# Altium PCB PCB.PcbDoc (part 2 of 3)
Units mil, origin at the board's own origin, x right, y up, seen from the top; angles counter-clockwise.
Board outline 6000 x 4000 mil, 2 copper layers (Top Layer, Bottom Layer); 274 components, 212 nets, 893 pads, 35 vias.
Unrouted connection lines stored in the file: 511.
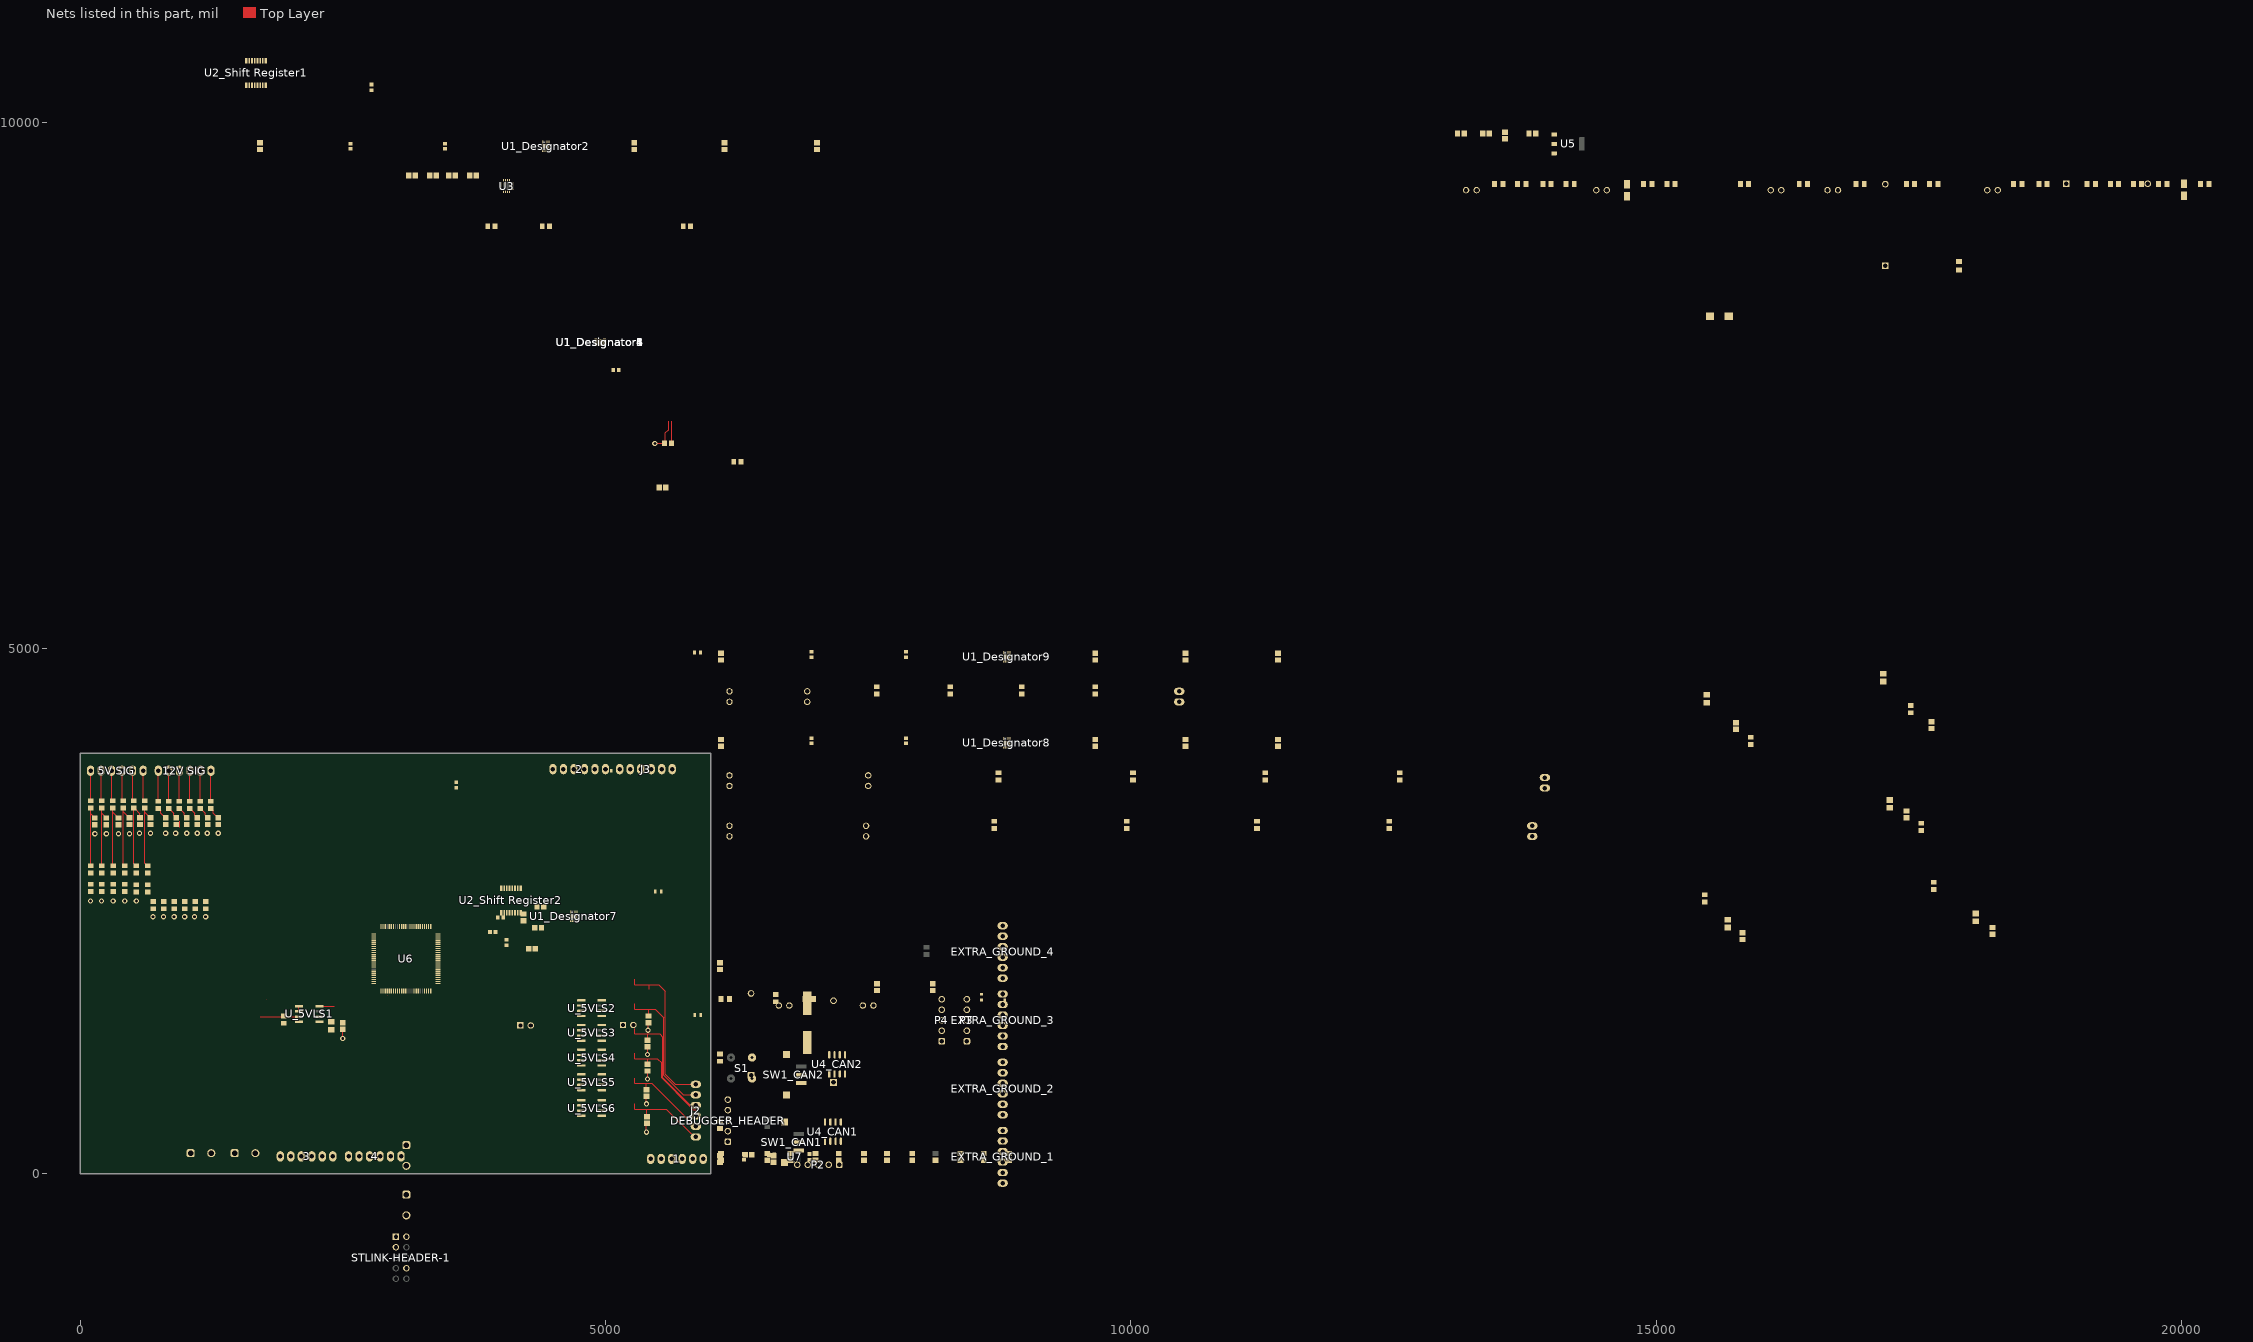
[diagram p2: the nets of this part, all layers, seen from the top]

## Part data (continued)
C8_5VLS1 C8_5VLS2 C8_5VLS3 C8_5VLS4 C8_5VLS5 C8_5VLS6 C28 C29 C30 C31 C32 C33 C34: library part CC0805MRX7R9BB104, "CAP CER 0.1UF 50V X7R 0805", Part Number=CC0805MRX7R9BB104
"C9_Shift Register1" "C9_Shift Register2" C40 C42: library part C0603C104K5RAC7411, "CAP CER 0.1UF 50V X7R 0603", Device Package="0603 (1608 Metric)", Manufacturer=KEMET, Operating Temperature="-55°C ~ 125°C", Supplier Part Number 1=399-C0603C104K5RAC7411CT-ND, Temperature Coefficient=X7R, Tolerance=±10%, Voltage - Rated=50V, Applications="Bypass, Decoupling", Capacitance="0.1 µF", ComponentLink1Description=Datasheet, ComponentLink1URL=https://api.kemet.com/component-edge/download/datasheet/C0603C104K5RAC7411.pdf, ComponentLink2Description="DigiKey Link", ComponentLink2URL=https://www.digikey.com/en/products/detail/kemet/C0603C104K5RAC7411/3317013, Lifecycle Status=Active, Minimum Order=1, Mounting Type="Surface Mount, MLCC", Package / Case="0603 (1608 Metric)", Packaging=TapeAndReel, Part Number=C0603C104K5RAC7411, Part Status=Active, partid=2233, Price=0.01, Series="SMD Comm X7R", Size / Dimension="0.063\" L x 0.031\" W (1.60mm x 0.80mm)", Supplier 1=DigiKey, Thickness (Max)="0.035\" (0.90mm)"
  "C9_Shift Register1" "C9_Shift Register2": LastUpdated="2023-06-20 7:12:54 PM"
  C40 C42: LastUpdated="2023-06-07 7:13:18 PM"
C10: library part CL21Y106KPQVPNE, "CAP CER 10UF 10V X7S 0805", Device Package="0805 (2012 Metric)", Manufacturer="Samsung Electro-Mechanics", Operating Temperature="-55°C ~ 125°C", Ratings=AEC-Q200, Supplier Part Number 1=1276-6685-1-ND, Temperature Coefficient=X7S, Tolerance=±10%, Voltage - Rated=10V, Applications=Automotive, Capacitance="10 µF", ComponentLink1Description=Datasheet, ComponentLink1URL=http://www.samsungsem.com/kr/support/product-search/mlcc/CL21Y106KPQVPNE.jsp, ComponentLink2Description="DigiKey Link", ComponentLink2URL=https://www.digikey.com/en/products/detail/samsung-electro-mechanics/CL21Y106KPQVPNE/5961169, LastUpdated="2023-10-22 7:13:43 PM", Lifecycle Status=Active, Minimum Order=1, Mounting Type="Surface Mount, MLCC", Package / Case="0805 (2012 Metric)", Packaging=TapeAndReel, Part Number=CL21Y106KPQVPNE, Part Status=Active, partid=2979, Price=0.06, Series=CL, Size / Dimension="0.079\" L x 0.049\" W (2.00mm x 1.25mm)", Supplier 1=DigiKey, Thickness (Max)="0.055\" (1.40mm)"
C12: library part C0805X332KARAC3316, "CAP CER 0805 3.3NF 250V X7R", Device Package="0805 (2012 Metric)", Manufacturer=KEMET, Operating Temperature="-55°C ~ 125°C", Ratings=AEC-Q200, Supplier Part Number 1=399-C0805X332KARAC3316CT-ND, Temperature Coefficient=X7R, Tolerance=±10%, Voltage - Rated=250V, Applications="Automotive, Boardflex Sensitive", Capacitance="3300 pF", ComponentLink1Description=Datasheet, ComponentLink1URL=https://api.kemet.com/component-edge/download/datasheet/C0805X332KARAC3316.pdf, ComponentLink2Description="DigiKey Link", ComponentLink2URL=https://www.digikey.com/en/products/detail/kemet/C0805X332KARAC3316/10315785, Features="Soft Termination", LastUpdated="2023-10-22 7:13:17 PM", Lifecycle Status=Active, Minimum Order=1, Mounting Type="Surface Mount, MLCC", Package / Case="0805 (2012 Metric)", Packaging=TapeAndReel, Part Number=C0805X332KARAC3316, Part Status=Active, partid=14175, Price=0.13, Series="SMD Auto X7R VW80808", Size / Dimension="0.079\" L x 0.049\" W (2.00mm x 1.25mm)", Supplier 1=DigiKey, Thickness (Max)="0.039\" (0.98mm)"
C13: library part CL21A226KOQNNNG, "CAP CER 22UF 16V X5R 0805", Device Package="0805 (2012 Metric)", Manufacturer="Samsung Electro-Mechanics", Operating Temperature="-55°C ~ 85°C", Supplier Part Number 1=1276-7092-1-ND, Temperature Coefficient=X5R, Tolerance=±10%, Voltage - Rated=16V, Applications="General Purpose", Capacitance="22 µF", ComponentLink1Description=Datasheet, ComponentLink1URL=//media.digikey.com/pdf/Data%20Sheets/Samsung%20PDFs/CL21A226KOQNNNG_Spec.pdf, ComponentLink2Description="DigiKey Link", ComponentLink2URL=https://www.digikey.com/en/products/detail/samsung-electro-mechanics/CL21A226KOQNNNG/3894433, LastUpdated="2023-10-22 7:13:43 PM", Lifecycle Status=Active, Minimum Order=1, Mounting Type="Surface Mount, MLCC", Package / Case="0805 (2012 Metric)", Packaging=TapeAndReel, Part Number=CL21A226KOQNNNG, Part Status=Active, partid=3000, Price=0.06, Series=CL, Size / Dimension="0.079\" L x 0.049\" W (2.00mm x 1.25mm)", Supplier 1=DigiKey, Thickness (Max)="0.055\" (1.40mm)"
C18: library part C2012X6S1C106K125AC, "CAP CER 10UF 16V X6S 0805", Device Package="0805 (2012 Metric)", Manufacturer="TDK Corporation", Operating Temperature="-55°C ~ 105°C", Supplier Part Number 1=445-7611-1-ND, Temperature Coefficient=X6S, Tolerance=±10%, Voltage - Rated=16V, Applications="General Purpose", Capacitance="10 µF", ComponentLink1Description=Datasheet, ComponentLink1URL=https://product.tdk.com/info/en/catalog/datasheets/mlcc_commercial_general_en.pdf?ref_disty=digikey, ComponentLink2Description="DigiKey Link", ComponentLink2URL=https://www.digikey.com/en/products/detail/tdk-corporation/C2012X6S1C106K125AC/2733046, Features="Low ESL", LastUpdated="2023-10-02 7:13:05 PM", Lifecycle Status=Active, Minimum Order=1, Mounting Type="Surface Mount, MLCC", Package / Case="0805 (2012 Metric)", Packaging=TapeAndReel, Part Number=C2012X6S1C106K125AC, Part Status=Active, partid=2995, Price=0.07, Series=C, Size / Dimension="0.079\" L x 0.049\" W (2.00mm x 1.25mm)", Supplier 1=DigiKey, Thickness (Max)="0.057\" (1.45mm)"
C20: library part PMK212BBJ107MG-T, "CAP CER 100UF 2.5V X5R 0805", Device Package="0805 (2012 Metric)", Manufacturer="Taiyo Yuden", Operating Temperature="-55°C ~ 85°C", Supplier Part Number 1=587-3978-1-ND, Temperature Coefficient=X5R, Tolerance=±20%, Voltage - Rated=2.5V, Applications="SMPS Filtering", Capacitance="100 µF", ComponentLink1Description=Datasheet, ComponentLink1URL="https://ds.yuden.co.jp/TYCOMPAS/ut/detail?pn=PMK212BBJ107MG-T  &u=M", ComponentLink2Description="DigiKey Link", ComponentLink2URL=https://www.digikey.com/en/products/detail/taiyo-yuden/PMK212BBJ107MG-T/4950524, LastUpdated="2023-10-02 7:12:56 PM", Lifecycle Status=Active, Minimum Order=1, Mounting Type="Surface Mount, MLCC", Package / Case="0805 (2012 Metric)", Packaging=TapeAndReel, Part Number=PMK212BBJ107MG-T, Part Status=Active, partid=7580, Price=0.48, Series=M, Size / Dimension="0.079\" L x 0.049\" W (2.00mm x 1.25mm)", Supplier 1=DigiKey, Thickness (Max)="0.053\" (1.35mm)"
C23 C24: library part CMP-2006-02836-2, "Chip Multilayer Ceramic Capacitors for General Purpose, 0603, 2.2uF, X7R, 15%, 10%, 10V", Capacitance=2.2uF, Case Code (Imperial)=0603, Case Code (Metric)=1608, Dielectric=X7R, Max Operating Temperature=125°C, Min Operating Temperature=-55°C, Package Quantity=1, Tolerance=10%, Voltage=10V, Case/Package=0603, Depth=0.8mm, Height=0.8mm, Lead Free="Lead Free", Length=1.6mm, Material=Ceramic, Mount="Surface Mount", Number of Pins=2, Packaging="Cut Tape", REACH SVHC="No SVHC", Termination=SMD/SMT, Thickness=0.035inch, Voltage Rating=10V, Voltage Rating (DC)=10V, Weight=7.1E-05oz, Width=0.031inch
C25 C27: library part CBR08C809CAGAC, "CAP CER 8PF 250V C0G/NP0 0805", Part Number=CBR08C809CAGAC
C41: library part C0603C103K4RECAUTO, "CAP CER 0603 10NF 16V X7R 10%", Device Package="0603 (1608 Metric)", Manufacturer=KEMET, Operating Temperature="-55°C ~ 125°C", Ratings=AEC-Q200, Supplier Part Number 1=399-17880-1-ND, Temperature Coefficient=X7R, Tolerance=±10%, Voltage - Rated=16V, Applications="Automotive, ESD Protection", Capacitance="10000 pF", ComponentLink1Description=Datasheet, ComponentLink1URL=https://api.kemet.com/component-edge/download/datasheet/C0603C103K4RECAUTO.pdf, ComponentLink2Description="DigiKey Link", ComponentLink2URL=https://www.digikey.com/en/products/detail/kemet/C0603C103K4RECAUTO/8640474, LastUpdated="2023-06-07 7:13:03 PM", Lifecycle Status=Active, Minimum Order=1, Mounting Type="Surface Mount, MLCC", Package / Case="0603 (1608 Metric)", Packaging=TapeAndReel, Part Number=C0603C103K4RECAUTO, Part Status=Active, partid=8251, Price=0.01, Series="ESD SMD Auto X7R", Size / Dimension="0.063\" L x 0.031\" W (1.60mm x 0.80mm)", Supplier 1=DigiKey, Thickness (Max)="0.034\" (0.87mm)"
C43: library part CC0603ZRY5V6BB225, "CAP CER 2.2UF 10V Y5V 0603", Device Package="0603 (1608 Metric)", Manufacturer=Yageo, Operating Temperature="-30°C ~ 85°C", Supplier Part Number 1=311-1450-1-ND, Temperature Coefficient="Y5V (F)", Tolerance="-20%, +80%", Voltage - Rated=10V, Applications="General Purpose", Capacitance="2.2 µF", ComponentLink1Description=Datasheet, ComponentLink1URL=http://www.yageo.com/documents/recent/UPY-GPHC_Y5V_6.3V-to-50V_8.pdf, ComponentLink2Description="DigiKey Link", ComponentLink2URL=https://www.digikey.com/en/products/detail/yageo/CC0603ZRY5V6BB225/2833615, LastUpdated="2023-06-07 7:13:18 PM", Lifecycle Status=Active, Minimum Order=1, Mounting Type="Surface Mount, MLCC", Package / Case="0603 (1608 Metric)", Packaging=TapeAndReel, Part Number=CC0603ZRY5V6BB225, Part Status=Active, partid=2248, Price=0.01, Series=CC, Size / Dimension="0.063\" L x 0.031\" W (1.60mm x 0.80mm)", Supplier 1=DigiKey, Thickness (Max)="0.035\" (0.90mm)"
C44: library part C0805X475J9RACAUTO, "CAP CER 4.7UF 6.3V X7R 0805", Part Number=C0805X475J9RACAUTO
D1 D2: library part CMP-0548-00224-2, "Transient Voltage Suppressor, 6.40 to 231 V, 14 V Stand-off Voltage, Uni-Directional, -55 to 155 degC, 2-pin DO-214AC, Pb-Free, Tape and Reel", Manufacturer="Vishay Semiconductor", Operating Junction and Storage Temperature Range="-55 to 150 degC", ComponentLink1Description="Manufacturer URL", ComponentLink1URL=http://www.vishay.com/, ComponentLink2Description=Datasheet, ComponentLink2URL=http://www.vishay.com/docs/88390/smaj50a.pdf, ComponentLink3Description="Package Specification", ComponentLink3URL=http://www.vishay.com/docs/88390/smaj50a.pdf, DatasheetVersion=12/8/2013, ID (uA)=1, IFSM="40 A", Mounting Technology="Surface Mount", PackageDescription="2-Pin DO-214AC (SMA), Body 4.245 x 2.665 mm", PackageReference=DO-214AC-2, Packing="Tape and Reel", PartNumber=SMAJ14A-E3/61, PPPM (W)="400, 300", RoHS=TRUE, VBR Uni-Directional (V)="6.4 to 231", VWM (V)=14
DEBUGGER_HEADER P2 P3 P4: library part CMP-1502-01068-2, Color=Black, Contact Resistance=20mΩ, Current Rating=3A, Max Operating Temperature=105°C, Min Operating Temperature=-40°C, Operating Supply Voltage=250V, Connector Type="Male Pin", Contact Material=Copper, Contact Mating Length=5.9944mm, Contact Plating=Gold, Gender=Male, Height=8.89mm, Lead Free="Lead Free", Lead Pitch=2.54mm, Mount="Through Hole", NexarPartId=32855526, Number of Contacts=5, Number of Pins=5, Number of Positions=5, Number of Rows=1, Orientation=Vertical, Packaging=Bulk, Pitch=2.54mm, REACH SVHC=Unknown, RoHS=Compliant, Termination=Solder, Voltage Rating=250V
"DS1_Motor Controller 1" "DS1_Motor Controller 2" DS1_Steering "DS2_Motor Controller 1" "DS2_Motor Controller 2" DS2_Steering DS5 DS6 DS7 DS8 DS9 DS12 DS13: library part CMP-2000-06413-1, "T-1 3/4 (5 mm) Low Current LED Lamp, Green, 1.9 V, -20 to 100 degC, 2-Pin THD, RoHS, Bulk", Color=Green, Dominant Wavelength/Color Temperature=569nm, Manufacturer=AvagoTechnologies, Package=2T-13/4, Package Description="2-Pin Through Hole Device, Dia 5.845 mm, Pitch 2.54 mm", Category=LEDs, Datasheet URL=http://docs.avagotech.com/docs/AV02-1557EN, Datasheet Version=07/2014, Intensity=2.3mcd, Lens Appearance=ColoredDiffused, Lens Shape Type=Circular, Manufacturer URL=http://www.avagotech.com/, Mounting=ThroughHole, Mounting Orientation=TopMount, Mounting Technology=ThroughHole, Number of LEDs=1, Package Reference=HLMP-4740, Packaging=Bulk, Peak Wavelength=565nm, Pin Count=2, Rad Hard=No, Type=Uni-Color, Viewing Angle=50°
"J1_Motor Controller 1" "J1_Motor Controller 2" J1_Steering: "TERM BLK 2P SIDE ENT 2.54MM PCB", Color=Green, Current=10A, Manufacturer="TE Connectivity AMP Connectors", Supplier Part Number 1=A98333-ND, Voltage=150V, ComponentLink1Description=Datasheet, ComponentLink1URL=https://www.te.com/commerce/DocumentDelivery/DDEController?Action=srchrtrv&DocNm=282834&DocType=Customer+Drawing&DocLang=English, ComponentLink2Description="DigiKey Link", ComponentLink2URL=http://digikey.com/product-detail/en/te-connectivity-amp-connectors/282834-2/A98333-ND/1150135, LastUpdated="2020-01-15 4:15:38 AM", Lifecycle Status=Active, Mating Orientation="Horizontal with Board", Minimum Order=1, Mounting Type="Through Hole", Number of Levels=1, Packaging=Bulk, Part Number=282834-2, Part Status=Active, Pitch="0.100\" (2.54mm)", Positions Per Level=2, Price=0.88, Series=Buchanan, Supplier 1=DigiKey, Wire Gauge="16-30 AWG", Wire Termination="Screw - Rising Cage Clamp"
J5 J6 J7 J8: library part CMP-1502-03324-2, Current Rating=16A, Max Operating Temperature=120°C, Min Operating Temperature=-30°C, Voltage Rating=300V, Contact Material="Nickel, Tin", Height=11.6mm, Lead Pitch=5mm, NexarPartId=78871135, Number of Contacts=2, Number of Pins=2, Number of Rows=1, Packaging=Box, RoHS=Non-Compliant
J9 J10: library part CMP-2000-05888-3, "CONN HEADER VERT 2POS 2.5MM", Color=Natural, Contact Resistance=20mR, Current Rating=3A, Housing Color=White, Insulation Resistance=1GR, Max Operating Temperature=85°C, Max Voltage Rating (AC)=250V, Min Operating Temperature=-25°C, Connector Type="Male Pin", Contact Material=Brass, Contact Plating=Tin, Contact Type="Male Pin", Depth=5.75mm, Fastening Type=Detent, Housing Material=Polyamide, Lead Free="Lead Free", Lead Pitch=2.5mm, Length=7.4mm, Max Current Rating=3A, Max Voltage Rating (DC)=250V, Mount="Through Hole", Number of Contacts=2, Number of Positions=2, Number of Rows=1, Orientation=Straight, Packaging=Bulk, Pitch=2.5mm, REACH SVHC="No SVHC", Series=XH, Termination=Solder, Voltage Rating=250V, Voltage Rating (AC)=250V, Wire/Cable Gauge=22AWG
L1: library part SRP5030T-2R2M, "FIXED IND 2.2UH 5.5A 35 MOHM SMD", Current - Saturation=9A, Current Rating (Amps)="5.5 A", DC Resistance (DCR)="35mOhm Max", Device Package=Nonstandard, Inductance Frequency - Test="100 kHz", Manufacturer="Bourns Inc.", Operating Temperature="-40°C ~ 125°C", Supplier Part Number 1=SRP5030T-2R2MCT-ND, Tolerance=±20%, ComponentLink1Description=Datasheet, ComponentLink1URL=https://www.bourns.com/docs/Product-Datasheets/SRP5030T.pdf, ComponentLink2Description="DigiKey Link", ComponentLink2URL=https://www.digikey.com/en/products/detail/bourns-inc/SRP5030T-2R2M/3986082, Height - Seated (Max)="0.118\" (3.00mm)", Inductance="2.2 µH", LastUpdated="2023-10-22 8:26:41 PM", Lifecycle Status=Active, Material - Core="Iron Powder", Minimum Order=1, Mounting Type="Surface Mount", Package / Case=Nonstandard, Packaging=TapeAndReel, Part Number=SRP5030T-2R2M, Part Status=Active, partid=7, Price=0.59, Series=SRP5030T, Shielding=Shielded, Size / Dimension="0.224\" L x 0.205\" W (5.70mm x 5.20mm)", Supplier 1=DigiKey, Type="Drum Core, Wirewound"
R1_Designator1 R1_Designator2 R1_Designator3 R1_Designator4 R1_Designator5 R1_Designator6 R2_Designator1 R2_Designator2 R2_Designator3 R2_Designator4 R2_Designator5 R2_Designator6 R4_1 R4_2 R4_3 R4_4 R4_5 R4_6: library part CRCW0805300KJNEA, "RES SMD 300K OHM 5% 1/8W 0805", Device Package="0805 (2012 Metric)", Manufacturer="Vishay Dale", Operating Temperature="-55°C ~ 155°C", Power (Watts)="0.125W, 1/8W", Ratings=AEC-Q200, Supplier Device Package=0805, Supplier Part Number 1=541-300KACT-ND, Temperature Coefficient=±200ppm/°C, Tolerance=±5%, ComponentLink1Description=Datasheet, ComponentLink1URL=http://www.vishay.com/docs/20035/dcrcwe3.pdf, ComponentLink2Description="DigiKey Link", ComponentLink2URL=https://www.digikey.com/en/products/detail/vishay-dale/CRCW0805300KJNEA/1175257, Composition="Thick Film", Features="Automotive AEC-Q200", Height - Seated (Max)="0.020\" (0.50mm)", LastUpdated="2023-10-02 7:52:37 PM", Lifecycle Status=Active, Minimum Order=1, Number of Terminations=2, Package / Case="0805 (2012 Metric)", Packaging=TapeAndReel, Part Number=CRCW0805300KJNEA, Part Status=Active, partid=29510, Price=0.01, Resistance="300 kOhms", Series=CRCW, Size / Dimension="0.079\" L x 0.049\" W (2.00mm x 1.25mm)", Supplier 1=DigiKey
R3_Designator1 R3_Designator2 R3_Designator3 R3_Designator4 R3_Designator5 R3_Designator6: library part RT0805DRD07150KL, "RES SMD 150K OHM 0.5% 1/8W 0805", Device Package="0805 (2012 Metric)", Manufacturer=Yageo, Operating Temperature="-55°C ~ 155°C", Power (Watts)="0.125W, 1/8W", Supplier Device Package=0805, Supplier Part Number 1=311-2706-1-ND, Temperature Coefficient=±25ppm/°C, Tolerance=±0.5%, ComponentLink1Description=Datasheet, ComponentLink1URL=https://www.yageo.com/upload/media/product/productsearch/datasheet/rchip/PYu-RT_1-to-0.01_RoHS_L_11.pdf, ComponentLink2Description="DigiKey Link", ComponentLink2URL=https://www.digikey.com/en/products/detail/yageo/RT0805DRD07150KL/1077874, Composition="Thin Film", Height - Seated (Max)="0.024\" (0.60mm)", LastUpdated="2023-10-02 7:52:44 PM", Lifecycle Status=Active, Minimum Order=1, Number of Terminations=2, Package / Case="0805 (2012 Metric)", Packaging=TapeAndReel, Part Number=RT0805DRD07150KL, Part Status=Active, partid=27806, Price=0.02, Resistance="150 kOhms", Series=RT, Size / Dimension="0.079\" L x 0.049\" W (2.00mm x 1.25mm)", Supplier 1=DigiKey
R5_1 R5_2 R5_3 R5_4 R5_5 R5_6 R16: library part CPF0805B100KE, "RES SMD 100K OHM 0.1% 1/10W 0805", Device Package="0805 (2012 Metric)", Manufacturer="TE Connectivity Passive Product", Operating Temperature="-55°C ~ 155°C", Power (Watts)="0.1W, 1/10W", Supplier Device Package=0805, Supplier Part Number 1=A106042CT-ND, Temperature Coefficient=±25ppm/°C, Tolerance=±0.1%, ComponentLink1Description=Datasheet, ComponentLink1URL=https://www.te.com/commerce/DocumentDelivery/DDEController?Action=srchrtrv&DocNm=1773200&DocType=DS&DocLang=English, ComponentLink2Description="DigiKey Link", ComponentLink2URL=https://www.digikey.com/en/products/detail/te-connectivity-passive-product/CPF0805B100KE/2389788, Composition="Thin Film", Height - Seated (Max)="0.026\" (0.65mm)", Lifecycle Status=Active, Minimum Order=1, Number of Terminations=2, Package / Case="0805 (2012 Metric)", Packaging=TapeAndReel, Part Number=CPF0805B100KE, Part Status=Active, partid=27729, Price=0.09, Resistance="100 kOhms", Series="CPF, Neohm", Size / Dimension="0.079\" L x 0.049\" W (2.00mm x 1.25mm)", Supplier 1=DigiKey
  R5_1 R5_2 R5_3 R5_4 R5_5 R5_6: LastUpdated="2023-10-02 7:52:44 PM"
  R16: LastUpdated="2023-10-22 7:55:33 PM"
"R6_Motor Controller 1" "R6_Motor Controller 2" R6_Steering "R7_Motor Controller 1" "R7_Motor Controller 2" R7_Steering: library part RT0805DRD073KL, "RES SMD 3K OHM 0.5% 1/8W 0805", Device Package="0805 (2012 Metric)", Manufacturer=Yageo, Operating Temperature="-55°C ~ 155°C", Power (Watts)="0.125W, 1/8W", Supplier Device Package=0805, Supplier Part Number 1=311-2744-1-ND, Temperature Coefficient=±25ppm/°C, Tolerance=±0.5%, ComponentLink1Description=Datasheet, ComponentLink1URL=https://www.yageo.com/upload/media/product/productsearch/datasheet/rchip/PYu-RT_1-to-0.01_RoHS_L_11.pdf, ComponentLink2Description="DigiKey Link", ComponentLink2URL=https://www.digikey.com/en/products/detail/yageo/RT0805DRD073KL/1078142, Composition="Thin Film", Height - Seated (Max)="0.024\" (0.60mm)", LastUpdated="2023-10-02 7:52:44 PM", Lifecycle Status=Active, Minimum Order=1, Number of Terminations=2, Package / Case="0805 (2012 Metric)", Packaging=TapeAndReel, Part Number=RT0805DRD073KL, Part Status=Active, partid=27799, Price=0.02, Resistance="3 kOhms", Series=RT, Size / Dimension="0.079\" L x 0.049\" W (2.00mm x 1.25mm)", Supplier 1=DigiKey
"R8_Motor Controller 1" "R8_Motor Controller 2" R8_Steering "R9_Motor Controller 1" "R9_Motor Controller 2" R9_Steering: library part RCS08052K00FKEA, "RES SMD 2K OHM 1% 1/2W 0805", Device Package="0805 (2012 Metric)", Manufacturer="Vishay Dale", Operating Temperature="-55°C ~ 155°C", Power (Watts)="0.5W, 1/2W", Ratings=AEC-Q200, Supplier Device Package=0805, Supplier Part Number 1=541-2840-1-ND, Temperature Coefficient=±100ppm/°C, Tolerance=±1%, ComponentLink1Description=Datasheet, ComponentLink1URL=http://www.vishay.com/docs/20065/rcse3.pdf, ComponentLink2Description="DigiKey Link", ComponentLink2URL=https://www.digikey.com/en/products/detail/vishay-dale/RCS08052K00FKEA/5866986, Composition="Thick Film", Features="Automotive AEC-Q200, Pulse Withstanding", Height - Seated (Max)="0.020\" (0.50mm)", LastUpdated="2023-10-02 7:52:44 PM", Lifecycle Status=Active, Minimum Order=1, Number of Terminations=2, Package / Case="0805 (2012 Metric)", Packaging=TapeAndReel, Part Number=RCS08052K00FKEA, Part Status=Active, partid=27786, Price=0.02, Resistance="2 kOhms", Series="RCS e3", Size / Dimension="0.079\" L x 0.049\" W (2.00mm x 1.25mm)", Supplier 1=DigiKey
R10_Designator1 R10_Designator2 R10_Designator3 R10_Designator4 R10_Designator5 R10_Designator6 R10_Designator7 R10_Designator8 R10_Designator9 R14: library part RNCS0603BKE100K, "RES 100K OHM 0.1% 1/16W 0603", Device Package="0603 (1608 Metric)", Manufacturer="Stackpole Electronics Inc", Operating Temperature="-55°C ~ 155°C", Power (Watts)="0.063W, 1/16W", Ratings=AEC-Q200, Supplier Device Package=0603, Supplier Part Number 1=RNCS0603BKE100KCT-ND, Temperature Coefficient=±25ppm/°C, Tolerance=±0.1%, ComponentLink1Description=Datasheet, ComponentLink1URL=https://www.seielect.com/catalog/sei-rncs_rnch.pdf, ComponentLink2Description="DigiKey Link", ComponentLink2URL=https://www.digikey.com/en/products/detail/stackpole-electronics-inc/RNCS0603BKE100K/1708835, Composition="Thin Film", Features="Anti-Corrosive, Automotive AEC-Q200, Moisture Resistant", Height - Seated (Max)="0.022\" (0.55mm)", Lifecycle Status=Active, Minimum Order=1, Number of Terminations=2, Package / Case="0603 (1608 Metric)", Packaging=TapeAndReel, Part Number=RNCS0603BKE100K, Part Status=Active, partid=4849, Price=0.07, Resistance="100 kOhms", Series=RNCS, Size / Dimension="0.061\" L x 0.031\" W (1.55mm x 0.80mm)", Supplier 1=DigiKey
  R10_Designator1 R10_Designator2 R10_Designator3 R10_Designator4 R10_Designator5 R10_Designator6 R10_Designator7 R10_Designator8 R10_Designator9: LastUpdated="2023-06-04 7:36:27 PM"
  R14: LastUpdated="2023-06-08 7:45:17 PM"
R11_Designator1 R11_Designator2 R11_Designator3 R11_Designator4 R11_Designator5 R11_Designator6 R11_Designator7 R11_Designator8 R11_Designator9: library part RNCS0603BKE10K0, "RES 10K OHM 0.1% 1/16W 0603", Device Package="0603 (1608 Metric)", Manufacturer="Stackpole Electronics Inc", Operating Temperature="-55°C ~ 155°C", Power (Watts)="0.063W, 1/16W", Ratings=AEC-Q200, Supplier Device Package=0603, Supplier Part Number 1=RNCS0603BKE10K0CT-ND, Temperature Coefficient=±25ppm/°C, Tolerance=±0.1%, ComponentLink1Description=Datasheet, ComponentLink1URL=https://www.seielect.com/catalog/sei-rncs_rnch.pdf, ComponentLink2Description="DigiKey Link", ComponentLink2URL=https://www.digikey.com/en/products/detail/stackpole-electronics-inc/RNCS0603BKE10K0/1708836, Composition="Thin Film", Features="Anti-Corrosive, Automotive AEC-Q200, Moisture Resistant", Height - Seated (Max)="0.022\" (0.55mm)", LastUpdated="2023-06-04 7:36:27 PM", Lifecycle Status=Active, Minimum Order=1, Number of Terminations=2, Package / Case="0603 (1608 Metric)", Packaging=TapeAndReel, Part Number=RNCS0603BKE10K0, Part Status=Active, partid=4838, Price=0.07, Resistance="10 kOhms", Series=RNCS, Size / Dimension="0.061\" L x 0.031\" W (1.55mm x 0.80mm)", Supplier 1=DigiKey
R12_5VLS1 R12_5VLS2 R12_5VLS3 R12_5VLS4 R12_5VLS5 R12_5VLS6: library part RNCS0805BKE10K0, "RES 10K OHM 0.1% 1/10W 0805", Part Number=RNCS0805BKE10K0
R13_5VLS1 R13_5VLS2 R13_5VLS3 R13_5VLS4 R13_5VLS5 R13_5VLS6: library part CMP-2001-00852-1, Manufacturer=Panasonic, Part Number=ERA6AEB5621V
R15: library part ERA-6AEB84R5V, "RES 84.5 OHM 0.1% 1/8W 0805", Device Package="0805 (2012 Metric)", Manufacturer="Panasonic Electronic Components", Operating Temperature="-55°C ~ 155°C", Power (Watts)="0.125W, 1/8W", Ratings=AEC-Q200, Supplier Device Package=0805, Supplier Part Number 1=P84.5DACT-ND, Temperature Coefficient=±25ppm/°C, Tolerance=±0.1%, ComponentLink1Description=Datasheet, ComponentLink1URL=https://industrial.panasonic.com/cdbs/www-data/pdf/RDM0000/AOA0000C307.pdf, ComponentLink2Description="DigiKey Link", ComponentLink2URL=https://www.digikey.com/en/products/detail/panasonic-electronic-components/ERA-6AEB84R5V/2025567, Composition="Thin Film", Features="Automotive AEC-Q200", Height - Seated (Max)="0.024\" (0.60mm)", LastUpdated="2023-10-22 7:54:59 PM", Lifecycle Status=Active, Minimum Order=1, Number of Terminations=2, Package / Case="0805 (2012 Metric)", Packaging=TapeAndReel, Part Number=ERA-6AEB84R5V, Part Status=Active, partid=35707, Price=0.03, Resistance="84.5 Ohms", Series=ERA-6A, Size / Dimension="0.079\" L x 0.049\" W (2.00mm x 1.25mm)", Supplier 1=DigiKey
R17: library part ERJ-6ENF20R5V, "RES SMD 20.5 OHM 1% 1/8W 0805", Device Package="0805 (2012 Metric)", Manufacturer="Panasonic Electronic Components", Operating Temperature="-55°C ~ 155°C", Power (Watts)="0.125W, 1/8W", Ratings=AEC-Q200, Supplier Device Package=0805, Supplier Part Number 1=P20.5CCT-ND, Temperature Coefficient=±100ppm/°C, Tolerance=±1%, ComponentLink1Description=Datasheet, ComponentLink1URL=https://industrial.panasonic.com/cdbs/www-data/pdf/RDA0000/AOA0000C304.pdf, ComponentLink2Description="DigiKey Link", ComponentLink2URL=https://www.digikey.com/en/products/detail/panasonic-electronic-components/ERJ-6ENF20R5V/110953, Composition="Thick Film", Features="Automotive AEC-Q200", Height - Seated (Max)="0.028\" (0.70mm)", LastUpdated="2023-10-22 7:55:22 PM", Lifecycle Status=Active, Minimum Order=1, Number of Terminations=2, Package / Case="0805 (2012 Metric)", Packaging=TapeAndReel, Part Number=ERJ-6ENF20R5V, Part Status=Active, partid=30259, Price=0.01, Resistance="20.5 Ohms", Series=ERJ-6EN, Size / Dimension="0.079\" L x 0.049\" W (2.00mm x 1.25mm)", Supplier 1=DigiKey
R18 R19: library part RNCS0805BKE10R0, "RES 10 OHM 0.1% 1/10W 0805", Device Package="0805 (2012 Metric)", Manufacturer="Stackpole Electronics Inc", Operating Temperature="-55°C ~ 155°C", Power (Watts)="0.1W, 1/10W", Ratings=AEC-Q200, Supplier Device Package=0805, Supplier Part Number 1=RNCS0805BKE10R0CT-ND, Temperature Coefficient=±25ppm/°C, Tolerance=±0.1%, ComponentLink1Description=Datasheet, ComponentLink1URL=https://www.seielect.com/catalog/sei-rncs_rnch.pdf, ComponentLink2Description="DigiKey Link", ComponentLink2URL=https://www.digikey.com/en/products/detail/stackpole-electronics-inc/RNCS0805BKE10R0/1800064, Composition="Thin Film", Features="Anti-Corrosive, Automotive AEC-Q200, Moisture Resistant", Height - Seated (Max)="0.026\" (0.65mm)", LastUpdated="2023-10-22 7:55:33 PM", Lifecycle Status=Active, Minimum Order=1, Number of Terminations=2, Package / Case="0805 (2012 Metric)", Packaging=TapeAndReel, Part Number=RNCS0805BKE10R0, Part Status=Active, partid=27711, Price=0.07, Resistance="10 Ohms", Series=RNCS, Size / Dimension="0.079\" L x 0.049\" W (2.00mm x 1.25mm)", Supplier 1=DigiKey
R20_CAN1 R20_CAN2 R63_CAN1 R63_CAN2: library part ERJ-6ENF1200V, "RES SMD 120 OHM 1% 1/8W 0805", Part Number=ERJ-6ENF1200V
R25 R26 R54 R55: library part CMP-26527-000011-1, "RES 0 OHM JUMPER 1/10W 0603", Manufacturer=Stackpole, Package=RMCF0603, Power Rating=0.1W, Resistance=0mΩ, Temperature="-55°C to +155°C", Temperature Range High=+155°C, Temperature Range Low=-55°C, Voltage Rating=75V, Automotive=Yes, Automotive Grade="Grade 0", Category=Res, ComponentLink2Description=Datasheet, ComponentLink2URL=https://www.seielect.com/catalog/sei-rmcf_rmcp.pdf, Composition="Thick Film", Device Class L1="Passive Components", Device Class L2=Resistors, Device Class L3="Chip SMD Resistors", Digikey Description="RES 0 OHM JUMPER 1/10W 0603", Height=0.55mm, Ipc Land Pattern Name=RESC15580X45, Lead Free=Yes, Manufacturer Part Number=RMCF0603ZT0R00, Octopart=https://octopart.com/rmcf0603zt0r00-stackpole+electronics-19213618, RoHS=TRUE, Series=RMCF
R28 R29 R30 R31 R32 R33 R34 R36 R37 R38 R39 R41 R42 R43 R44 R45 R46 R47 R48 R60 R62: library part CMP-2100-03671-1, "Chip Resistor, 1 KOhm, +/- 1%, 125 mW, -55 to 155 degC, 0805 (2012 Metric), RoHS, Tape and Reel", Case Code (Imperial)=0805, Case Code (Metric)=2012, Manufacturer=Yageo, Max Operating Temperature=155degC, Max Power Dissipation=125mW, Min Operating Temperature=-55degC, Package Description="2-Pin Surface Mounted Device, Body 2 x 1.25 mm", Package Quantity=1, Resistance=1KOhm, Temperature Coefficient=100ppm/degreesC, Tolerance=1%, Voltage Rating=150V, Case/Package=0805, Composition=ThickFilm, Datasheet URL=http://www.yageo.com/NewPortal/yageodocoutput?fileName=/pdf/R-Chip/PYu-RC_Group_51_RoHS_L_5.pdf, Datasheet Version="Rev. 5, 10/2016", Depth=1.25mm, Height=0.024inch, Lead Free=LeadFree, Length=0.079inch, Manufacturer URL=http://www.yageo.com/, Military Standard=Not, Number of Pins=2, Number of Terminations=2, Package Reference=0805, Packaging=TapeandReel, Power Rating=125mW, REACH SVHC=Unknown, RoHSCompliant=true, Termination=SMD/SMT, Voltage Rating (DC)=150V, Width=0.049inch
R35 R40 R59 R61: library part CMP-00030-39746512-1, "AC01000005000JA100 Res Wirewound 500 Ohm 5% 1W 100ppm/°C to 180ppm/°C Conformal AXL Thru-Hole Ammo Pack", Case/Package=Axial, Max Operating Temperature=275°C, Max Power Dissipation=1W, Min Operating Temperature=-40°C, Resistance=500Ω, Temperature Coefficient=180ppm/°C, Tolerance=5%, Voltage Rating=22V, Composition=Wirewound, Contact Plating=Tin, Diameter=4.3mm, Features="Flame Retardant Coating", Lead Diameter=800µm, Length=11mm, NexarPartId=39746512, Number of Pins=2, Number of Terminations=2, Packaging="Tape & Box (TB)", Power Rating=1W, Radiation Hardening=No, REACH SVHC=Unknown, RoHS=Compliant, Schedule B="8533210080, 8533210080", Termination=Axial, Voltage Rating (DC)=22V, Weight=519.986953mg
R58: library part RNCS0805BKE10K0, "RES 10K OHM 0.1% 1/10W 0805", Device Package="0805 (2012 Metric)", Manufacturer="Stackpole Electronics Inc", Operating Temperature="-55°C ~ 155°C", Power (Watts)="0.1W, 1/10W", Ratings=AEC-Q200, Supplier Device Package=0805, Supplier Part Number 1=RNCS0805BKE10K0CT-ND, Temperature Coefficient=±25ppm/°C, Tolerance=±0.1%, ComponentLink1Description=Datasheet, ComponentLink1URL=https://www.seielect.com/catalog/sei-rncs_rnch.pdf, ComponentLink2Description="DigiKey Link", ComponentLink2URL=https://www.digikey.com/en/products/detail/stackpole-electronics-inc/RNCS0805BKE10K0/1800067, Composition="Thin Film", Features="Anti-Corrosive, Automotive AEC-Q200, Moisture Resistant", Height - Seated (Max)="0.026\" (0.65mm)", LastUpdated="2023-10-12 7:56:55 PM", Lifecycle Status=Active, Minimum Order=1, Number of Terminations=2, Package / Case="0805 (2012 Metric)", Packaging=TapeAndReel, Part Number=RNCS0805BKE10K0, Part Status=Active, partid=27713, Price=0.07, Resistance="10 kOhms", Series=RNCS, Size / Dimension="0.079\" L x 0.049\" W (2.00mm x 1.25mm)", Supplier 1=DigiKey
S1: "SWITCH PUSH SPST-NO 0.4VA 28V", Color - Actuator/Cap=Red, Current Rating (Amps)="0.4VA (AC/DC)", Manufacturer="NKK Switches", Operating Temperature="-30°C ~ 85°C", Supplier Part Number 1=360-2604-ND, Voltage Rating - AC=28V, Actuator Type="Round, Button", Circuit=SPST-NO, ComponentLink1Description=Datasheet, ComponentLink1URL=https://www.nkkswitches.com/pdf/Apushbuttons.pdf, ComponentLink2Description="DigiKey Link", ComponentLink2URL=http://digikey.com/product-detail/en/nkk-switches/AB11AH-HC/360-2604-ND/1056046, Features="Sealed - Fully", LastUpdated="2020-01-25 8:05:42 PM", Lifecycle Status=Active, Minimum Order=1, Mounting Type="Through Hole, Right Angle", Packaging=Tray, Part Number=AB11AH-HC, Part Status=Active, Price=5.00, Series=AB, Supplier 1=DigiKey, Switch Function=Off-Mom, Termination Style="PC Pin", Type=Standard, Voltage Rating - DC=28V
STLINK-HEADER-1: library part CMP-03369-000006-1, "CONN HEADER VERT 10POS 2.54MM", Current Rating=5A, Manufacturer="TE Connectivity", Temperature="-65°C to +105°C", Temperature Range High=+105°C, Temperature Range Low=-65°C, Automotive=No, Category=Conn, ComponentLink2Description=Datasheet, ComponentLink2URL=https://www.te.com/commerce/DocumentDelivery/DDEController?Action=showdoc&DocId=Customer+Drawing%7F826629%7FAC%7Fpdf%7FEnglish%7FENG_CD_826629_AC.pdf%7F826925-5, Conn Gender=Male, Conn Orientation=Vertical, Contact Material=Tin,Nickel, Device Class L1=Connectors, Device Class L2="Headers and Wire Housings", Device Class L3=unset, Digikey Description="CONN HEADER VERT 10POS 2.54MM", Height=9.9mm, Lead Free=Yes, Manufacturer Part Number=826925-5, Mouser Description="Headers & Wire Housings 2X05 POS VERT TIN", Number of Contacts=10, Number of Rows=2, Octopart=https://octopart.com/826925-5-te+connectivity-41836231, Package=826925-5, Pitch=2.54mm, RoHS=TRUE, Standoff Height=0.3mm
SW1_CAN1 SW1_CAN2: library part CMP-31746-000001-1, "SWITCH SLIDE SPDT 0.4VA 28V", Case/Package=SMD/SMT, Max Current Rating=100mA, Max Operating Temperature=85°C, Max Voltage Rating (AC)=28V, Min Operating Temperature=-25°C, Package Quantity=1, Actuator Length=2mm, Actuator Material=Polyphenylene, Actuator Type=Standard, Contact Material=Bronze, Contact Plating=Gold, Contact Style=Shorting, Depth=7.45mm, Electrical Life=10000Cycles, Housing Material=Bronze, Lead Free="Lead Free", Length=10.5mm, Max Voltage Rating (DC)=28V, Mechanical Life=10000Cycles, Mount="Surface Mount", Orientation="Right Angle", Packaging="Tape and Reel", REACH SVHC="No SVHC", RoHS Compliant=Yes, Series=SS3, Switch Function=On-On, Switch Travel=2mm, Termination="Gull Wing", Throw Configuration=SPDT, Voltage Rating (AC)=28V, Voltage Rating (DC)=28V
U1_Designator1 U1_Designator2 U1_Designator3 U1_Designator4 U1_Designator5 U1_Designator6 U1_Designator7 U1_Designator8 U1_Designator9: "No Description Available", Mfr_Name=onsemi, Copyright="Copyright (C) 2023 Ultra Librarian. All rights reserved.", Manufacturer_Part_Number=NCP45524IMNTWG-H, RefDes=RefDes, Type=DEV
"U2_Shift Register1" "U2_Shift Register2": library part CMP-14351-000004-1, "IC SHIFT REGISTER 8BIT 16TSSOP"
U3: library part CMP-0323-00146-3, "Buck Step Down Regulator with 3 to 17 V Input and 5 V Output, -40 to 85 degC, 16-Pin QFN (RGT), Green (RoHS & no Sb/Br)", Manufacturer="Texas Instruments", Rating=Catalog, Switch Current Limit(Typ)(A)=4.2, Code_JEDEC=MO-220, ComponentLink1Description=Datasheet, ComponentLink1URL=http://www.ti.com/general/docs/lit/getliterature.tsp?genericPartNumber=TPS62133&fileType=pdf, ComponentLink2Description="Package Specification", ComponentLink2URL=http://www.ti.com/litv/pdf/mpqf119g, ComponentLink3Description="URL Link1", ComponentLink3URL="Samples URL:http://www.ti.com/product/tps62133#samples", DatasheetVersion=SLVSAG7, Duty Cycle(Max)(%)=100, Eco-Plan="Green (RoHS & no Sb/Br)", Iout(Max)(A)=3, Iq(Typ)(mA)=0.017, Mounting Technology="Surface Mount", PackageDescription="16-Pin Plastic Quad Flat No-Lead, 3 x 3 mm Body, 0.5 mm Pitch, 1.7 x 1.7 mm Exposed Pad", PackageReference=RGT0016C, PackageVersion="revH, Oct-2011", PartNumber=TPS62133RGTR, Preset Vout(V)=5, Regulated Outputs(#)=1, SubFamily="Step-Down Regulator", Synchronous Rectification=TRUE, Topology=Buck, Vin(Max)(V)=17, Vin(Min)(V)=3, Vout(Max)(V)=5, Vout(Min)(V)=5
U4_CAN1 U4_CAN2: library part CMP-06279-000006-1, "IC TRANSCEIVER 1/1 8SOIC", Case/Package=SOIC, Max Operating Temperature=125°C, Min Operating Temperature=-40°C, Data Rate=8Mbps, Mount="Surface Mount", Packaging=Rail/Tube, Receiver Hysteresis=200mV
U5: "Sot223/Pkg 1-Amp 3.3-Volt Low Drop Out Voltage Regulatator", Package="SOT-223 Seeed Technology", Availability="Not in stock", Check_prices=https://www.snapeda.com/parts/AMS1117-3.3/Advanced+Monolithic+Systems/view-part/?ref=eda, MF="Advanced Monolithic Systems", MP=AMS1117-3.3, Price=None, SnapEDA_Link=https://www.snapeda.com/parts/AMS1117-3.3/Advanced+Monolithic+Systems/view-part/?ref=snap
U6: library part CMP-12105-000075-1, "IC MCU 32BIT 512KB FLASH 100LQFP", Ambient Temperature Range High=+85°C, Ambient Temperature Range Low=-40°C, Frequency=180MHz, Manufacturer=STMicroelectronics, Max Junction Temp=+125°C, Max Supply Voltage=3.6V, Min Supply Voltage=1.65V, Nominal Supply Current=1.4-86mA, Package=LQFP100-1L, Temperature="-40°C to +85°C", Automotive=No, Category=IC, ComponentLink2Description=Datasheet, ComponentLink2URL=https://www.st.com/resource/en/datasheet/stm32f446ve.pdf, Core Architecture="ARM Cortex-M4", Data Bus Width=32bits, Device Class L1="Integrated Circuits (ICs)", Device Class L2="Embedded Processors and Controllers", Device Class L3=Microcontrollers, Digikey Description="IC MCU 32BIT 512KB FLASH 100LQFP", Height=1.6mm, Interface=I2C,SPI,UART,USART,Parallel,CAN,USB,LIN,IrDA,I2S,Other, Ipc Land Pattern Name=QFP50P1600X1600X160-100, Lead Free=Yes, Manufacturer Part Number=STM32F446VET6, Memory Size=512KBytes, Memory Type=FLASH, Mouser Description="ARM Microcontrollers - MCU High-performance and DSP with FPU, ARM Cortex-M4 MCU with 512 Kbytes Flash, 180 MHz CPU, Art Accelerator, SDRAM", Number Of A/D Converters=3, Number Of Adc Channels=16, Number Of Cores=1, Number Of I2C Channels=4, Number Of I/Os=81, Number Of Spi Channels=4, Number Of Timers/Counters=14, Number Of Uart Channels=6, Number Of Usb Channels=2, Octopart=https://octopart.com/stm32f446vet6-stmicroelectronics-52642922, Ram Size=128KBytes, RoHS=TRUE, Standoff Height=0.05mm, Temperature Range High=+85°C, Temperature Range Low=-40°C
U7: library part CMP-2000-07589-1, "High Performance 6-Axis MEMS MotionTracking(TM) Device, 1.71 to 3.45 V, -40 to 85 degC, 16-Pin LGA, RoHS", Manufacturer=InvenSense, Max Operating Temperature=85degC, Min Operating Temperature=-40degC, Package Description="16-Pin Land Grid Array, Body 3 x 3 mm, Pitch 0.5 mm", Package Reference=I62-16, Datasheet URL=http://www.invensense.com/wp-content/uploads/2016/10/DS-000176-ICM-20602-v1.0.pdf, Datasheet Version="Rev. 1.0, 10/2016", Manufacturer URL=http://www.invensense.com/, Mounting Technology=SurfaceMount, Output Type=I2C, RoHSCompliant=True, Sensor Type=Temperature
U_5VLS1 U_5VLS2 U_5VLS3 U_5VLS4 U_5VLS5 U_5VLS6: "Power Switch/Driver 1:1 P-Channel 1.2A 8-SO", Package="SOIC-8 STMicroelectronics", Availability=Unavailable, MF=STMicroelectronics, MP=ST890CDR, Price=None, SnapEDA_Link=https://www.snapeda.com/parts/ST890CDR/STMicroelectronics/view-part/496092/?ref=snap
Y1: library part ABLS-8.000MHZ-SD7Y-T, "CRYSTAL 8.0000MHZ 18PF SMD", ESR (Equivalent Series Resistance)="80 Ohms", Frequency Stability=±30ppm, Frequency Tolerance=±15ppm, Load Capacitance=18pF, Manufacturer="Abracon LLC", Operating Mode=Fundamental, Operating Temperature="-40°C ~ 85°C", Package / Case=HC-49/US, Supplier Part Number 1=535-14365-2-ND, ComponentLink1Description=Datasheet, ComponentLink1URL=https://abracon.com/Resonators/abls.pdf, ComponentLink2Description="DigiKey Link", ComponentLink2URL=https://www.digikey.com/en/products/detail/abracon-llc/ABLS-8-000MHZ-SD7Y-T/8581989, Frequency="8 MHz", Height - Seated (Max)="0.165\" (4.20mm)", LastUpdated="2023-10-12 8:28:08 PM", Lifecycle Status=Active, Minimum Order=1, Mounting Type="Surface Mount", Packaging=CutTape, Part Number=ABLS-8.000MHZ-SD7Y-T, Part Status=Active, partid=25, Price=0.27, Series=ABLS, Size / Dimension="0.449\" L x 0.185\" W (11.40mm x 4.70mm)", Supplier 1=DigiKey, Type="MHz Crystal"

## Via types
v1: diameter 50, hole 28, Top Layer to Bottom Layer, 30 vias
v2: diameter 19.68, hole 11.81, Top Layer to Bottom Layer, 5 vias

## Nets (pads, with @x,y where several pads share a name; then routed paths per layer and width w, separated by ;. In a path a pad name is that pad's centre, name@x,y a point inside that pad or via, vN(x,y) a via of type N, cw(c..) or ccw(c..) an arc to the next point about the centre after c; other vN are vias at no path point)
5-3_1: C2_Designator6.2 R1_Designator6.1 R2_Designator6.2 U6.29 | length 649
  Top Layer w5: R1_Designator6.1@96.06,3481.1 R1_Designator6.1@100,3481.1 100,3423.03 ; R2_Designator6.2@100,2929.45 100,3423.03 ; C2_Designator6.2@165.06,3408.09 141.97,3385 C2_Designator6.2@140,3385 138.03,3385 100,3423.03 ; 2922.83,1694.88 2925,1692.72
5-3_2: C2_Designator5.2 R1_Designator5.1 R2_Designator5.2 U6.30 | length 652.5
  Top Layer w5: R1_Designator5.1@201.06,3480.55 R1_Designator5.1@205,3480.55 205,3428.03 ; R2_Designator5.2@205,2929.45 205,3428.03 ; C2_Designator5.2@275.06,3408.09 251.97,3385 C2_Designator5.2@250,3385 248.03,3385 205,3428.03
5-3_3: C2_Designator4.2 R1_Designator4.1 R2_Designator4.2 U6.31 | length 636
  Top Layer w5: R1_Designator4.1@306.06,3480.55 R1_Designator4.1@310,3480.55 310,3438.03 ; R2_Designator4.2@315,2929.45 310,2934.45 310,3438.03 ; C2_Designator4.2@366.97,3385 C2_Designator4.2@365,3385 363.03,3385 310,3438.03
5-3_4: C2_Designator3.2 R1_Designator3.1 R2_Designator3.2 U6.32 | length 647.8
  Top Layer w5: R1_Designator3.1@406.06,3481.1 R1_Designator3.1@410,3481.1 410,3444.53 ; R2_Designator3.2@425,2929.45 410,2944.45 410,3444.53 ; C2_Designator3.2@471.97,3386.5 C2_Designator3.2@470,3386.5 468.03,3386.5 410,3444.53
5-3_5: C2_Designator2.2 R1_Designator2.1 R2_Designator2.2 U6.33 | length 688
  Top Layer w5: R2_Designator2.2@535,2929.45 531.06,2929.45 510,2950.51 R1_Designator2.1@510,3481.1 513.94,3481.1 570,3425.04 C2_Designator2.2@570,3386.5 C2_Designator2.2@571.97,3386.5
5-3_6: C2_Designator1.2 R1_Designator1.1 R2_Designator1.2 U6.34 | length 648.7
  Top Layer w5: R1_Designator1.1@611.06,3480.55 R1_Designator1.1@615,3480.55 615,3439.53 ; R2_Designator1.2@645,2929.45 641.06,2929.45 615,2955.51 615,3439.53 ; C2_Designator1.2@671.97,3386.5 C2_Designator1.2@670,3386.5 668.03,3386.5 615,3439.53
5V_CLOCK: "U2_Shift Register1.11" U6.1
5V_DATA: "U2_Shift Register1.14" U6.5
5V_FAULT: R14.1 U6.80 U_5VLS1.8 U_5VLS2.8 U_5VLS3.8 U_5VLS4.8 U_5VLS5.8 U_5VLS6.8 | length 142.6
  Top Layer w5: U_5VLS1.8@2277.44,1595 2420,1595
5V_LATCH: "U2_Shift Register1.12" U6.3
12-3_1: C3_6.2 R4_6.1 R5_6.2 U6.15 | length 127.4
  Top Layer w5: R4_6.1@741.06,3475.55 R4_6.1@745,3475.55 748.94,3475.55 769.07,3455.41 769.07,3430.45 813.03,3386.5 C3_6.2@815,3386.5 C3_6.2@816.97,3386.5
12-3_2: C3_5.2 R4_5.1 R5_5.2 U6.16 | length 186.2
  Top Layer w5: R4_5.1@841.06,3475.55 R4_5.1@845,3475.55 848.94,3475.55 869.07,3455.41 869.07,3451.48 889.94,3430.61 889.94,3409.59 913.03,3386.5 C3_5.2@915,3386.5 C3_5.2@916.97,3386.5 ; 950,3294.75 950.06,3294.81 950.06,3352.2 950,3352.26 950,3353.46
12-3_3: C3_4.2 R4_4.1 R5_4.2 U6.36 | length 127.4
  Top Layer w5: R4_4.1@941.06,3475.55 R4_4.1@945,3475.55 948.94,3475.55 969.07,3455.41 969.07,3451.48 989.94,3430.61 989.94,3409.59 1013.03,3386.5 C3_4.2@1015,3386.5 C3_4.2@1016.97,3386.5
12-3_4: C3_3.2 R4_3.1 R5_3.2 U6.18 | length 127.4
  Top Layer w5: R4_3.1@1041.06,3475.55 R4_3.1@1045,3475.55 1048.94,3475.55 1069.07,3455.41 1069.07,3451.48 1089.94,3430.61 1089.94,3409.59 1113.03,3386.5 C3_3.2@1115,3386.5 C3_3.2@1116.97,3386.5
12-3_5: C3_2.2 R4_2.1 R5_2.2 U6.26 | length 127.4
  Top Layer w5: R4_2.1@1141.06,3475.55 R4_2.1@1145,3475.55 1148.94,3475.55 1169.07,3455.41 1169.07,3451.48 1189.94,3430.61 1189.94,3409.59 1213.03,3386.5 C3_2.2@1215,3386.5 C3_2.2@1216.97,3386.5
12-3_6: C3_1.2 R4_1.1 R5_1.2 U6.25 | length 127.4
  Top Layer w5: R4_1.1@1241.06,3475.55 R4_1.1@1245,3475.55 1248.94,3475.55 1269.07,3455.41 1269.07,3430.45 1313.03,3386.5 C3_1.2@1315,3386.5 C3_1.2@1316.97,3386.5
12V_CLOCK: "U2_Shift Register2.11" U6.78
12V_DATA: "U2_Shift Register2.14" U6.35
12V_LATCH: "U2_Shift Register2.12" U6.77
AC_CS: U6.82 U7.5
AC_INT: U6.79 U7.6
AC_SCL: U6.84 U7.2
AC_SDI: U6.54 U7.3
AC_SDO: U6.17 U7.4
CAN1_N: J9.2 U4_CAN1.6
CAN1_P: J9.1 U4_CAN1.7
CAN1_RX: U4_CAN1.4 U6.70
CAN1_STBY: U4_CAN1.8 U6.69
CAN1_TX: U4_CAN1.1 U6.71
CAN2_N: J10.2 U4_CAN2.6
CAN2_P: J10.1 U4_CAN2.7
CAN2_RX: U4_CAN2.4 U6.51
CAN2_STBY: U4_CAN2.8 U6.53
CAN2_TX: U4_CAN2.1 U6.52
CAN_CAN1_N: R20_CAN1.1
CAN_CAN1_P: SW1_CAN1.1
CAN_CAN2_N: R20_CAN2.1
CAN_CAN2_P: SW1_CAN2.1
EX_PIN_1: 3.1 U6.67
EX_PIN_2: P4.5 U6.81
EX_PIN_3: P4.4 U6.83
EX_PIN_4: P4.3 U6.85
EX_PIN_5: P4.2 U6.60
EX_PIN_6: P4.1 U6.97
EX_PIN_7: P3.5 U6.98
EX_PIN_8: P3.4 U6.2
EX_PIN_9: P3.3 U6.4
EX_PIN_10: P3.2 U6.40
EX_PIN_11: P3.1 U6.41
GND: 1.1 1.2 1.3 1.4 1.5 1.6 2.1 2.2 2.3 2.4 2.5 2.6 "C9_Shift Register1.2" "C9_Shift Register2.2" "DS1_Motor Controller 1.2" "DS1_Motor Controller 2.2" "DS2_Motor Controller 1.2" "DS2_Motor Controller 2.2" "J1_Motor Controller 1.2" "J1_Motor Controller 2.2" "U2_Shift Register1.8" "U2_Shift Register1.13" "U2_Shift Register2.8" "U2_Shift Register2.13" C1_Designator1.2 C1_Designator2.2 C1_Designator3.2 C1_Designator4.2 C1_Designator5.2 C1_Designator6.2 C1_Designator7.2 C1_Designator8.2 C1_Designator9.2 C2_Designator1.1 C2_Designator2.1 C2_Designator3.1 C2_Designator4.1 C2_Designator5.1 C2_Designator6.1 C3_1.1 C3_2.1 C3_3.1 C3_4.1 C3_5.1 C3_6.1 C4_Designator1.2 C4_Designator2.2 C4_Designator3.2 C4_Designator4.2 C4_Designator5.2 C4_Designator6.2 C4_Designator7.2 C4_Designator8.2 C4_Designator9.2 C5_Designator1.1 C5_Designator2.1 C5_Designator3.1 C5_Designator4.1 C5_Designator5.1 C5_Designator6.1 C5_Designator7.1 C5_Designator8.1 C5_Designator9.1 C6_Designator1.1 C6_Designator2.1 C6_Designator3.1 C6_Designator4.1 C6_Designator5.1 C6_Designator6.1 C6_Designator7.1 C6_Designator8.1 C6_Designator9.1 C7_5VLS1.1 C7_5VLS2.1 C7_5VLS3.1 C7_5VLS4.1 C7_5VLS5.1 C7_5VLS6.1 C8_5VLS1.1 C8_5VLS2.1 C8_5VLS3.1 C8_5VLS4.1 C8_5VLS5.1 C8_5VLS6.1 C10.1 C11.1 C12.1 C13.1 C18.1 C19.1 C20.1 C21.1 C23.2 C24.2 C25.2 C26_CAN1.1 C26_CAN2.1 C27.2 C28.1 C29.1 C30.1 C31.1 C32.1 C33.1 C34.1 C35.1 C36.1 C37.1 C38_CAN1.1 C38_CAN2.1 C40.2 C41.1 C42.1 C43.1 C44.1 D1.2 D2.2 DEBUGGER_HEADER.1 DS1_Steering.2 DS2_Steering.2 DS5.2 DS6.2 DS7.2 DS8.2 DS9.2 DS12.2 DS13.2 EXTRA_GROUND_1.1 EXTRA_GROUND_1.2 EXTRA_GROUND_1.3 EXTRA_GROUND_1.4 EXTRA_GROUND_1.5 EXTRA_GROUND_1.6 EXTRA_GROUND_2.1 EXTRA_GROUND_2.2 EXTRA_GROUND_2.3 EXTRA_GROUND_2.4 EXTRA_GROUND_2.5 EXTRA_GROUND_2.6 EXTRA_GROUND_3.1 EXTRA_GROUND_3.2 EXTRA_GROUND_3.3 EXTRA_GROUND_3.4 EXTRA_GROUND_3.5 EXTRA_GROUND_3.6 EXTRA_GROUND_4.1 EXTRA_GROUND_4.2 EXTRA_GROUND_4.3 EXTRA_GROUND_4.4 EXTRA_GROUND_4.5 EXTRA_GROUND_4.6 J1_Steering.2 J5.1 J6.1 P2.5 R3_Designator1.1 R3_Designator2.1 R3_Designator3.1 R3_Designator4.1 R3_Designator5.1 R3_Designator6.1 R5_1.1 R5_2.1 R5_3.1 R5_4.1 R5_5.1 R5_6.1 R13_5VLS1.1 R13_5VLS2.1 R13_5VLS3.1 R13_5VLS4.1 R13_5VLS5.1 R13_5VLS6.1 R19.1 R58.1 S1.1 STLINK-HEADER-1.3 STLINK-HEADER-1.8 SW1_CAN1.4 SW1_CAN1.5 SW1_CAN2.4 SW1_CAN2.5 U1_Designator1.4 U1_Designator2.4 U1_Designator3.4 U1_Designator4.4 U1_Designator5.4 U1_Designator6.4 U1_Designator7.4 U1_Designator8.4 U1_Designator9.4 U3.6 U3.7 U3.8 U3.15 U3.16 U4_CAN1.2 U4_CAN2.2 U5.1 U6.10 U6.20 U6.27 U6.49 U6.74 U6.99 U7.8 U7.13 U_5VLS1.4 U_5VLS2.4 U_5VLS3.4 U_5VLS4.4 U_5VLS5.4 U_5VLS6.4 | length 469.2
  Top Layer w5: v1(2500,1286.5) C8_5VLS1.1@2500,1373.5 ; v1(5390,395) 5390,473.5 C8_5VLS6.1@5395,478.5 ; v1(5390,665) C8_5VLS5.1@5390,737.01 ; v1(5400,900) C8_5VLS4.1@5400,977.01 ; v1(5400,1135) C8_5VLS3.1@5400,1208.5 ; v1(5405,1365) 5405,1432.01 C8_5VLS2.1@5410,1437.01
  other v1: 695,2445 795,2445 895,2445 995,2445 1090,2445 1195,2445 100,2595 205,2595 315,2595 425,2595 535,2595 140,3235 250,3235 365,3235 470,3235 565,3240 670,3240 815,3240 910,3240 1015,3240 1115,3240 1210,3240 1315,3240
MC1_ENABLE: U1_Designator7.2 U6.44
MC2_ENABLE: U1_Designator8.2 U6.45
Net3_2: 3.2 U6.9
Net3_3: 3.3 U6.8
Net3_4: 3.4 U6.7
Net3_5: 3.5 U6.64
Net3_6: 3.6 U6.63
Net4_1: 4.1 U6.88
Net4_2: 4.2 U6.55
Net4_3: 4.3 U6.56
Net4_4: 4.4 U6.57
Net4_5: 4.5 U6.58
Net4_6: 4.6 U6.59
"Net5V SIG_1": "5V SIG.1" R1_Designator6.2 | length 285
  Top Layer w5: R1_Designator6.2@100,3550 100,3835
"Net5V SIG_2": "5V SIG.2" R1_Designator5.2 | length 287.6
  Top Layer w5: 200,3835 200,3554.45 R1_Designator5.2@205,3549.45
"Net5V SIG_3": "5V SIG.3" R1_Designator4.2 | length 289.7
  Top Layer w5: 300,3835 300,3559.45 R1_Designator4.2@310,3549.45
"Net5V SIG_4": "5V SIG.4" R1_Designator3.2 | length 289.1
  Top Layer w5: 400,3835 400,3560 R1_Designator3.2@410,3550
"Net5V SIG_5": "5V SIG.5" R1_Designator2.2 | length 289.1
  Top Layer w5: 500,3835 500,3560 R1_Designator2.2@510,3550
"Net5V SIG_6": "5V SIG.6" R1_Designator1.2 | length 291.8
  Top Layer w5: 600,3835 600,3564.45 R1_Designator1.2@615,3549.45
"Net12V SIG_1": "12V SIG.1" R4_6.2 | length 290.6
  Top Layer w5: R4_6.2@745,3544.45 745,3835
"Net12V SIG_2": "12V SIG.2" R4_5.2 | length 290.6
  Top Layer w5: R4_5.2@845,3544.45 845,3835
"Net12V SIG_3": "12V SIG.3" R4_4.2 | length 290.6
  Top Layer w5: R4_4.2@945,3544.45 945,3835
"Net12V SIG_4": "12V SIG.4" R4_3.2 | length 290.6
  Top Layer w5: R4_3.2@1045,3544.45 1045,3835
"Net12V SIG_5": "12V SIG.5" R4_2.2 | length 290.6
  Top Layer w5: R4_2.2@1145,3544.45 1145,3835
"Net12V SIG_6": "12V SIG.6" R4_1.2 | length 290.6
  Top Layer w5: R4_1.2@1245,3544.45 1245,3835
NetC5_Designator1_2: C5_Designator1.2 J3.6 R11_Designator1.1 U1_Designator1.8
NetC5_Designator2_2: C5_Designator2.2 J3.5 R11_Designator2.1 U1_Designator2.8
NetC5_Designator3_2: C5_Designator3.2 J3.4 R11_Designator3.1 U1_Designator3.8
NetC5_Designator4_2: C5_Designator4.2 J3.3 R11_Designator4.1 U1_Designator4.8
NetC5_Designator5_2: C5_Designator5.2 J3.2 R11_Designator5.1 U1_Designator5.8
NetC5_Designator6_2: C5_Designator6.2 J3.1 R11_Designator6.1 U1_Designator6.8
NetC5_Designator7_2: "J1_Motor Controller 1.1" "R6_Motor Controller 1.2" C5_Designator7.2 R11_Designator7.1 U1_Designator7.8
NetC5_Designator8_2: "J1_Motor Controller 2.1" "R6_Motor Controller 2.2" C5_Designator8.2 R11_Designator8.1 U1_Designator8.8